# Altium PCB PCB1.PcbDoc
Units mm, origin at the board's own origin, x right, y up, seen from the top; angles counter-clockwise.
Board outline 77.98 x 58.8 mm, 2 copper layers (Top Layer, Bottom Layer), stack 1.111 mm thick; 67 components, 75 nets, 314 pads, 129 vias.
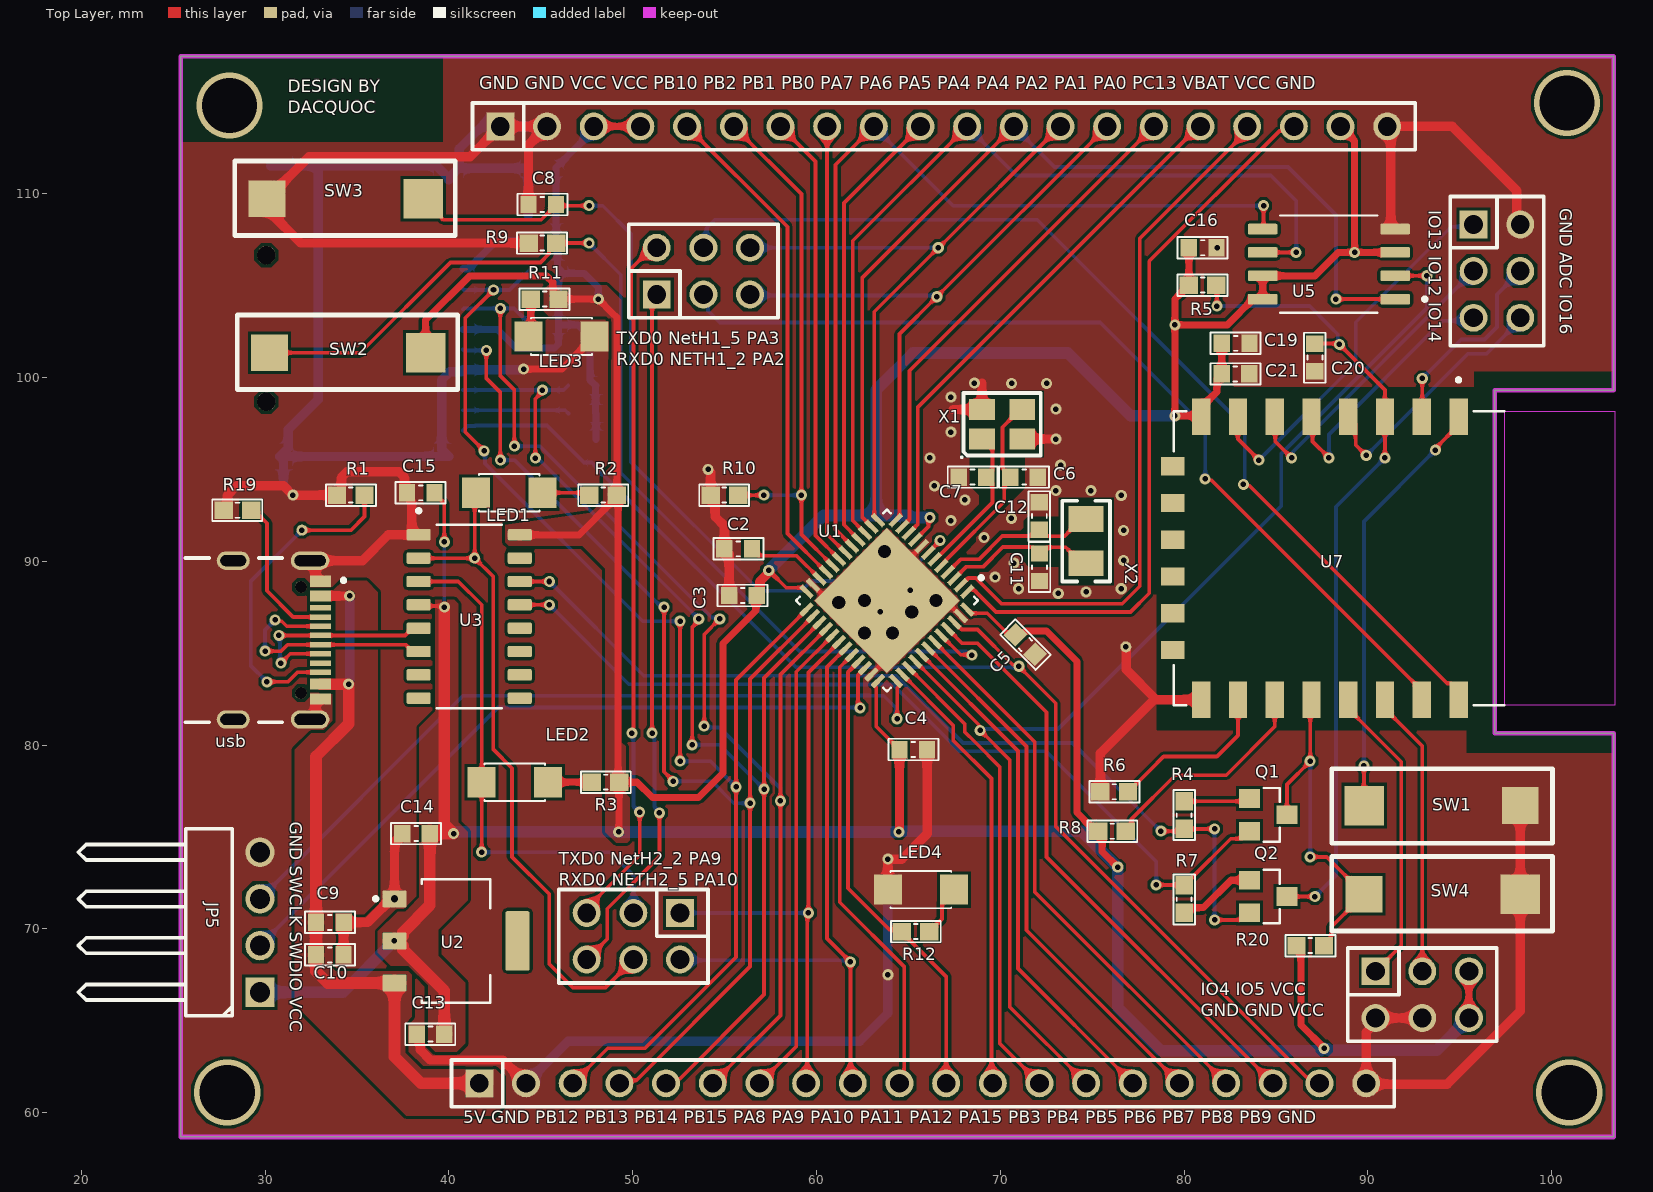
[diagram p0: Top Layer view]
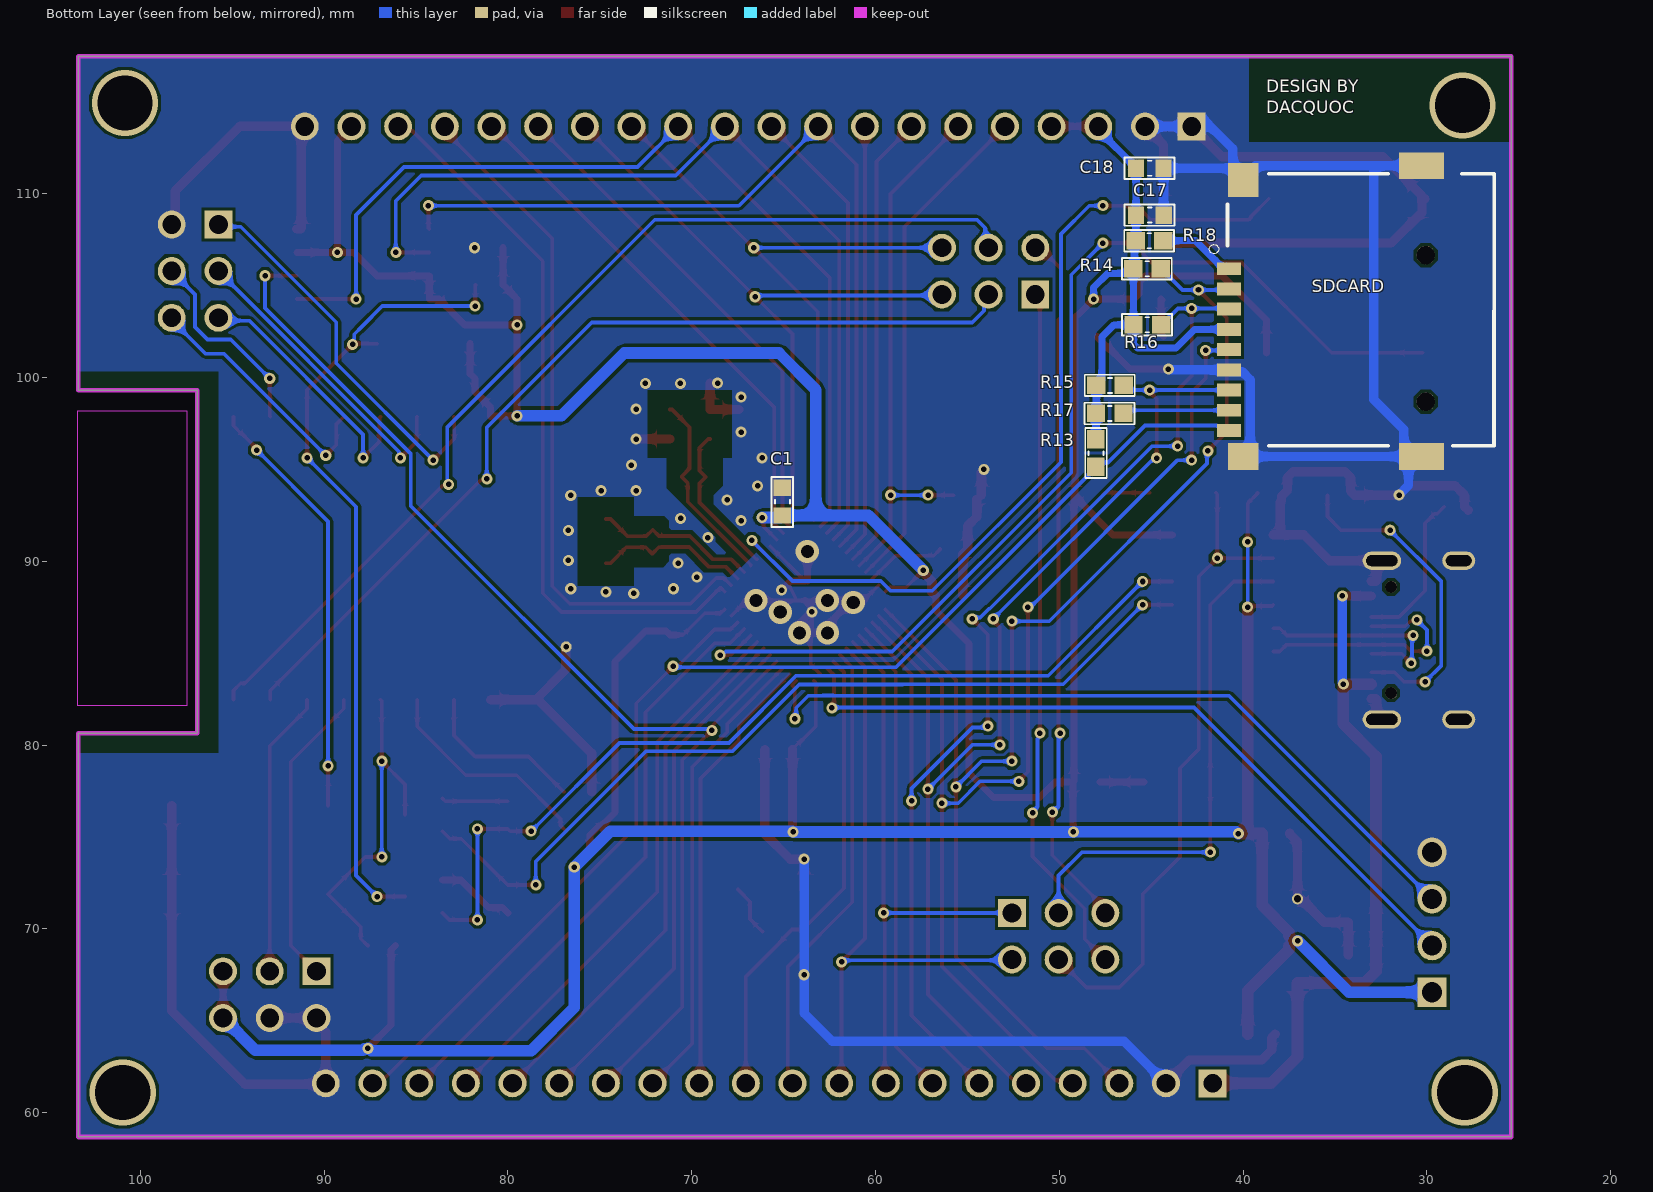
[diagram p1: Bottom Layer view, seen from below]
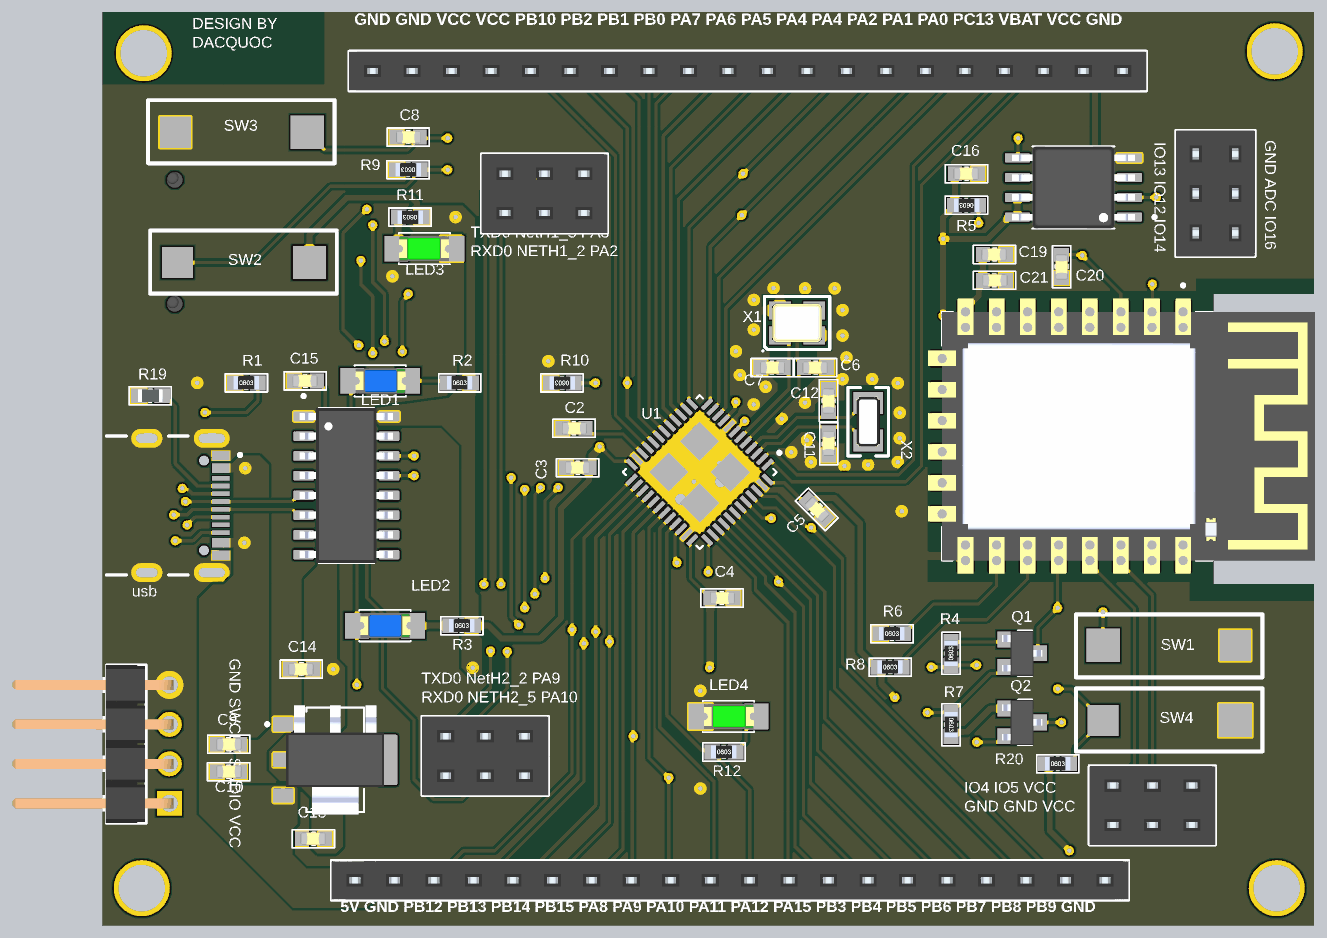
[diagram p2: 3D render of the assembled board from above, using the file's embedded part models]
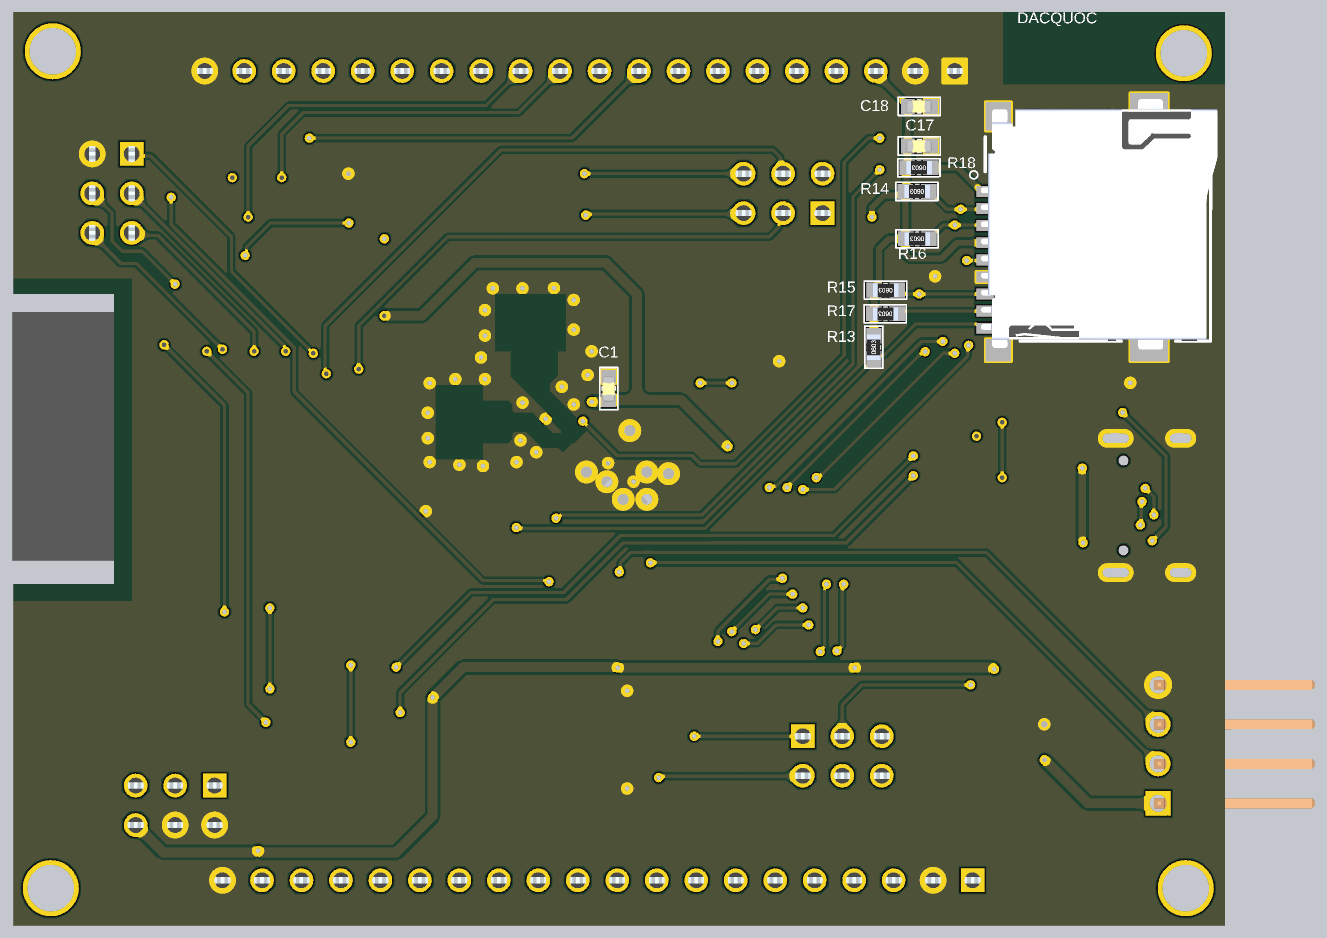
[diagram p3: 3D render of the assembled board from below, using the file's embedded part models]

## Layer stack, top to bottom
Top Solder: solder mask 0.0102, Solder Resist, Dk 3.5
Top Layer: signal copper 0.0356
Dielectric 2: dielectric 1.04, FR-4, Dk 4.8
Bottom Layer: signal copper 0.0356
Bottom Solder: solder mask 0.0102, Solder Resist, Dk 3.5

## Board outline
25.4,117.475 103.378,117.475 103.378,99.314 96.901,99.314 96.901,80.645 103.378,80.645 103.378,58.674 25.4,58.674

## Design rules (kind name [scope] priority, off if disabled: settings)
Clearance "Stitching No Net" [IsStitchingVia and InNet('No Net') vs (IsVia and (Not IsStitchingVia)) Or IsPad] p1: gap=0.1 ignorepadtopadclearanceinfootprint=FALSE
Clearance [All] p2: gap=0.152 ignorepadtopadclearanceinfootprint=FALSE
DiffPairsRouting DiffPairsRouting_1 [InDifferentialPair('USB')] p1: maxlimit=3 minlimit=0.15 mostfreqgap=0.254 toplayer_maxgap=0.3 toplayer_minwidth=0.18 toplayer_maxwidth=0.5 toplayer_prefwidth=0.381 bottomlayer_mingap=0.2 bottomlayer_minwidth=0.18 bottomlayer_maxwidth=0.5 bottomlayer_prefwidth=0.381 maxuncoupledlength=12.7
HoleSize [All] p1: absolutevalues=TRUE maxlimit=4 minlimit=0.025 maxpercent=80.000 minpercent=20.000
HoleToHoleClearance [All] p1: gap=0 allowstackedmicrovias=TRUE
LayerPairs [All] p1: enforce=FALSE
MinimumSolderMaskSliver [All] p1: minsoldermaskwidth=0
PolygonConnect [InNet('GND')] p1: connectstyle=Direct reliefconductorwidth=0.5 reliefentries=4 polygonreliefangle="45 Angle" airgapwidth=0.254
RoutingVias [All] p1: holewidth=0.711 width=1.27 viastyle="Through Hole" minholewidth=0.3 minwidth=0.5 maxholewidth=0.711 maxwidth=1.27
SilkToSilkClearance [All] p1: silktosilkclearance=0
SilkToSolderMaskClearance [IsPad] p1: minsilkscreentomaskgap=0 clearancetoexposedcopper=TRUE
SolderMaskExpansion [All] p1: expansion=0.102 istentingtop=FALSE
Width [All] p1: maxlimit=0.635 minlimit=0.203 preferedwidth=0.381
23 further rules are at their usual default settings.

## Classes and differential pairs
component class Sheet1: C1 C2 C3 C4 C5 C6 C7 C8 C9 C10 C11 C12 C13 C14 C15 C16 C17 C19 C20 C21 JP5 LED1 LED2 LED3 LED4 Q1 Q2 R1 R2 R3 R4 R5 R6 R7 R8 R9 R10 R11 R12 R13 R14 R15 R16 R17 R18 R19 R20 SDCARD SW1 SW2 SW3 SW4 U1 U2 U3 U5 U7 usb X1 X2

## Components (designator, comment, footprint, x,y, rotation, side; value= is the part's Value field where it differs from the comment)
C1 "100nF" "Cap 0603" 65.061,93.238 r270 bottom
C2 "4.7uF" "Cap 0603" 55.749,90.686 r0 top
C3 "100nF" "Cap 0603" 55.987,88.13 r180 top
C4 "100nF" "Cap 0603" 65.274,79.764 r0 top
C5 "100nF" "Cap 0603" 71.374,85.471 r315 top
C6 "18pF" "Cap 0603" 71.29,94.574 r180 top
C7 "18pF" "Cap 0603" 68.496,94.59 r0 top
C8 "100nF" "Cap 0603" 45.086,109.423 r0 top
C9 "10uF" "Cap 0603" 33.528,70.358 r0 top
C10 "100nF" "Cap 0603" 33.524,68.588 r0 top
C11 "9pF" "Cap 0603" 72.128,89.682 r90 top
C12 "9pF" "Cap 0603" 72.136,92.456 r270 top
C13 "100nF" "Cap 0603" 38.989,64.262 r180 top
C14 "10uF" "Cap 0603" 38.207,75.176 r180 top
C15 "100nF" "Cap 0603" 38.461,93.718 r180 top
C16 "100nF" "Cap 0603" 81.006,107.053 r180 top
C17 "10uF" "Cap 0603" 45.081,108.831 r0 bottom
C18 "100nF" "Cap 0603" 45.085,111.379 r0 bottom
C19 "100nF" "Cap 0603" 82.804,101.854 r180 top
C20 "100nF" "Cap 0603" 87.13,101.08 r270 top
C21 "10uF" "Cap 0603" 82.804,100.203 r0 top
H1 "JP 2x3 2.54" "JP 2x3 CT"#1 53.848,105.791 r0 top
H2 "JP 2x3 2.54" "JP 2x3 CT"#1 50.038,69.596 r180 top
JP1 "JP 2x3 2.54" "JP 2x3 CT"#1 97.028,105.791 r270 top
JP2 "JP 2x3 2.54" "JP 2x3 CT"#2 92.964,66.421 r0 top
JP5 "JP 1x4 2.54" "JP 1x4 DC" 27.178,75.438 r90 top
JP6 "JP 1x20 2.54" "JP 1x20 CT" 41.656,61.595 r0 top
JP7 "JP 1x20 2.54" "JP 1x20 CT" 42.799,113.665 r0 top
LED1 "LED" LED-1206-Blue 45.085,93.726 r180 top value="LED 3 - 5 ly 2 Colour"
LED2 "LED" LED-1206-Blue 45.39,77.978 r180 top value="LED 3 - 5 ly 2 Colour"
LED3 "LED" LED-1206-Green 44.323,102.235 r0 top value="LED 3 - 5 ly 2 Colour"
LED4 "LED" LED-1206-Green 67.488,72.136 r180 top value="LED 3 - 5 ly 2 Colour"
Q1 "S8050" SOT-23 84.582,76.2 r270 top
Q2 "S8050" SOT-23 84.582,71.755 r270 top
R1 "5.1K" "tro smd 0603" 34.659,93.599 r0 top
R2 "1K" "tro smd 0603" 48.387,93.599 r0 top
R3 "1K" "tro smd 0603" 48.526,77.978 r0 top
R4 "10K" "tro smd 0603" 80.01,76.188 r90 top
R5 "10K" "tro smd 0603" 81.014,105.029 r180 top
R6 "10K" "tro smd 0603" 76.2,77.459 r0 top
R7 "10K" "tro smd 0603" 80.01,71.616 r270 top
R8 "10K" "tro smd 0603" 76.085,75.311 r0 top
R9 "10K" "tro smd 0603" 45.085,107.315 r180 top
R10 "1K" "tro smd 0603" 54.991,93.599 r180 top
R11 "1K" "tro smd 0603" 45.212,104.267 r180 top
R12 "1K" "tro smd 0603" 65.393,69.85 r0 top
R13 "10K" "tro smd 0603" 48.006,95.885 r90 bottom
R14 "10K" "tro smd 0603" 45.224,105.918 r0 bottom
R15 "10K" "tro smd 0603" 47.244,99.568 r0 bottom
R16 "10K" "tro smd 0603" 45.212,102.87 r0 bottom
R17 "10K" "tro smd 0603" 47.256,98.044 r0 bottom
R18 "10K" "tro smd 0603" 45.097,107.442 r0 bottom
R19 "5.1K" "RES 0603" 28.496,92.777 r180 top
R20 "10K" "tro smd 0603" 86.868,69.088 r0 top
SDCARD "SDCARD" SDCARD 33.593,103.688 r90 bottom
SW1 "TACTILE SWITCH" SW_342_SMD 98.298,76.708 r0 top
SW2 "TACTILE SWITCH" SW_342_SMD 30.235,101.346 r180 top
SW3 "TACTILE SWITCH" SW_342_SMD 30.099,109.728 r180 top
SW4 "TACTILE SWITCH" SW_342_SMD 89.798,71.882 r180 top
U1 "STM32F411CEU6" QFN50P700X700X60-49N 63.836,87.864 r225 top
U2 "AMS1117-3.3" SOT229P700X180-4N 40.386,69.342 r270 top
U3 "CH340C" SOIC127P600X180-16N 41.104,86.995 r0 top
U5 "W25Q128JVSIQ" SOIC127P790X216-8N 87.884,106.172 r180 top
U7 "ESP-12F" XCVR_ESP-12F 91.44,90.17 r270 top
usb "USB4105-GF-A" GCT_USB4105-GF-A 28.265,85.713 r270 top (schematic designator USB2)
X1 "25MHz" "EPSON TSX-3225" 70.104,97.457 r0 top
X2 "32.768kHz" "ABRACON ABS07" 74.675,91.098 r270 top

## Footprints (in the part's own frame and the unit in brackets; to place one, negate y for a bottom-side part, rotate by r counter-clockwise, add the part's x,y. Pads: shape width x height; smd on the part's side, far side on the other; paste and mask are expansions set on the pad)
"ABRACON ABS07" [mm] "Crystal, 2-Leads, Body 3.20x1.50mm, IPC Medium Density"
  rect 1.4x1.9 smd: 1(-1.2,0) 2(1.2,0)
  silkscreen extent -2.2,-1.3 2.2,1.3, body extent -1.62,-0.77 1.63,0.78, height 0.9
"Cap 0603" [mm]
  rect 0.889x0.95 smd mask+0.076: 1(-0.758,-0.008) 2(0.742,-0.008)
  silkscreen extent -1.35,-0.59 1.36,0.58, body extent -0.77,-0.41 0.83,0.39, height 0.78
"EPSON TSX-3225" [mm] "Crystal, 4-Leads, Body 2.50x3.20mm, Pitch 2.20mm, IPC Medium Density"
  rect 1.4x1.15 smd: 1(-1.1,-0.8) 2(1.1,-0.8) 3(1.1,0.8) 4(-1.1,0.8)
  silkscreen extent -2.25,-1.85 2.1,1.7, body extent -1.61,-1.26 1.61,1.26, height 0.6
GCT_USB4105-GF-A [mm]
  rect 0.6x1.15 smd mask+0.05: A1_B12(-3.2,4.755) A4_B9(-2.4,4.755) B1_A12(3.2,4.755) B4_A9(2.4,4.755)
  rect 0.3x1.15 smd mask+0.05: A5(-1.25,4.755) A6(-0.25,4.755) A7(0.25,4.755) A8(1.25,4.755) B5(1.75,4.755) B6(0.75,4.755) B7(-0.75,4.755) B8(-1.75,4.755)
  oval 1x2.1 hole 0.6 slot 1.7 at 90 deg: SH1(-4.32,4.18) SH2(4.32,4.18)
  oval 1x1.8 hole 0.6 slot 1.4 at 90 deg: SH3(-4.32,0) SH4(4.32,0)
  round 0.65 hole 0.65 unplated: ""(-2.89,3.68) ""(2.89,3.68)
  silkscreen extent -4.47,-2.6 4.47,6.1
"JP 1x4 DC" [mm] "4 pins, 1 row, right angled, gold plating"
  rect 1.6x1.6 hole 1.1: 1(-8.89,-2.54)
  round 1.6 hole 1.1: 2(-6.35,-2.54) 3(-3.81,-2.54) 4(-1.27,-2.54)
  silkscreen extent -10.16,-1.04 0,7.34, body extent -10.16,-2.79 0,7.57, height 2.54
"JP 1x20 CT" [mm] "20 row, straight, gold plating"
  rect 1.52x1.52 hole 1.02: 1(0,0)
  round 1.52 hole 1.02: 2(2.54,0) 3(5.08,0) 4(7.62,0) 5(10.16,0) 6(12.7,0) 7(15.24,0) 8(17.78,0) 9(20.32,0) 10(22.86,0) 11(25.4,0) 12(27.94,0) 13(30.48,0) 14(33.02,0) 15(35.56,0) 16(38.1,0) 17(40.64,0) 18(43.18,0) 19(45.72,0) 20(48.26,0)
  silkscreen extent -1.52,-1.27 49.78,1.27, body extent -1.52,-1.25 49.78,1.25, height 8.51
"JP 2x3 CT"#1 [mm]
  rect 1.52x1.52 hole 1.02: 1(-2.54,-1.27)
  round 1.52 hole 1.02: 2(0,-1.27) 3(2.54,-1.27) 4(2.54,1.27) 5(0,1.27) 6(-2.54,1.27)
  silkscreen extent -4.06,-2.54 4.06,2.54, body extent -4.06,-2.54 4.06,2.54, height 8.51
"JP 2x3 CT"#2 [mm]
  rect 1.52x1.52 hole 1.02: 1(-2.54,1.27)
  round 1.52 hole 1.02: 2(0,1.27) 3(2.54,1.27) 4(2.54,-1.27) 5(0,-1.27) 6(-2.54,-1.27)
  silkscreen extent -4.06,-2.54 4.06,2.54, body extent -4.06,-2.54 4.06,2.54, height 8.51
LED-1206-Blue [mil] "Compoment SMD 120x60mil"
  rect 60x65 smd: 1(0,0) 2(142,0)
  silkscreen extent 6,-40 136,40, body extent 7,-31 133,32, height 43
LED-1206-Green [mil]
  rect 60x65 smd: 1(0,0) 2(142,0)
  silkscreen extent 6,-40 136,40, body extent 7,-31 133,32, height 43
QFN50P700X700X60-49N [mm]
  rrect25% 0.87x0.27 smd: 1(-3.43,2.75) 2(-3.43,2.25) 3(-3.43,1.75) 4(-3.43,1.25) 5(-3.43,0.75) 6(-3.43,0.25) 7(-3.43,-0.25) 8(-3.43,-0.75) 9(-3.43,-1.25) 10(-3.43,-1.75) 11(-3.43,-2.25) 12(-3.43,-2.75) 25(3.43,-2.75) 26(3.43,-2.25) 27(3.43,-1.75) 28(3.43,-1.25) 29(3.43,-0.75) 30(3.43,-0.25) 31(3.43,0.25) 32(3.43,0.75) 33(3.43,1.25) 34(3.43,1.75) 35(3.43,2.25) 36(3.43,2.75)
  rrect25% 0.27x0.87 smd: 13(-2.75,-3.43) 14(-2.25,-3.43) 15(-1.75,-3.43) 16(-1.25,-3.43) 17(-0.75,-3.43) 18(-0.25,-3.43) 19(0.25,-3.43) 20(0.75,-3.43) 21(1.25,-3.43) 22(1.75,-3.43) 23(2.25,-3.43) 24(2.75,-3.43) 37(2.75,3.43) 38(2.25,3.43) 39(1.75,3.43) 40(1.25,3.43) 41(0.75,3.43) 42(0.25,3.43) 43(-0.25,3.43) 44(-0.75,3.43) 45(-1.25,3.43) 46(-1.75,3.43) 47(-2.25,3.43) 48(-2.75,3.43)
  rect 5.6x5.6 smd paste-4: 49(0,0)
  silkscreen extent -4.6,-3.5 3.5,3.5
"RES 0603" [mm] "RES 0603"
  rect 1x0.95 smd mask+0.076: 1(-0.75,0) 2(0.75,0)
  silkscreen extent -1.35,-0.58 1.37,0.58, body extent -0.8,-0.4 0.8,0.4, height 0.45
SDCARD [mm]
  rect 0.7x1.3 smd: 1(2.23,7.174) 2(1.13,7.174) 3(0.03,7.174) 4(-1.07,7.174) 5(-2.17,7.174) 6(-3.27,7.174) 7(-4.37,7.174) 8(-5.47,7.174) CD1(-6.57,7.174)
  rect 1.448x1.651 smd: MP1(-7.989,6.4)
  rect 1.448x2.438 smd: MP2(-7.989,-3.3) MP3(7.836,-3.3)
  rect 1.854x1.651 smd: MP4(7.061,6.4)
  round 1 hole 1 unplated: ""(-5.004,-3.531) ""(2.972,-3.531)
  silkscreen extent -7.4,-7.26 7.4,8.24, body extent -7.94,-7.69 8.16,7.51, height 2
SOIC127P600X180-16N [mm]
  rrect25% 1.31x0.62 smd: 1(-2.75,4.445) 2(-2.75,3.175) 3(-2.75,1.905) 4(-2.75,0.635) 5(-2.75,-0.635) 6(-2.75,-1.905) 7(-2.75,-3.175) 8(-2.75,-4.445) 9(2.75,-4.445) 10(2.75,-3.175) 11(2.75,-1.905) 12(2.75,-0.635) 13(2.75,0.635) 14(2.75,1.905) 15(2.75,3.175) 16(2.75,4.445)
  silkscreen extent -2.85,-5 1.78,5.85, body extent -3,-5 3,5, height 1.8
SOIC127P790X216-8N [mm]
  rrect25% 1.61x0.58 smd: 1(-3.605,1.905) 2(-3.605,0.635) 3(-3.605,-0.635) 4(-3.605,-1.905) 5(3.605,-1.905) 6(3.605,-0.635) 7(3.605,0.635) 8(3.605,1.905)
  silkscreen extent -5.32,-2.64 2.64,2.64, body extent -3.95,-2.64 3.95,2.64, height 2.16
SOT229P700X180-4N [mm]
  rrect15% 0.93x1.31 smd: 1(-2.29,-3.345) 2(0,-3.345) 3(2.29,-3.345)
  rrect15% 3.24x1.31 smd: 4(0,3.345)
  silkscreen extent -3.36,-4.47 3.36,1.86, body extent -3.5,-3.15 3.5,3.15, height 1.8
SOT-23 [mil]
  rect 40x45 smd: 1(-35,-40) 2(35,-40) 3(0,40)
  silkscreen extent -58,-10 58,25, body extent -57,-51 57,51, height 55
SW_342_SMD [mm] "CASE: SMD"
  rect 2x2 smd: 1(0,0)
  rect 2.15x2.15 smd: 2(-8.5,0)
  silkscreen extent -10.25,-2.06 1.75,2, body extent -7.17,-1.79 -1.17,1.71, height 2.4
"tro smd 0603" [mm] "Chip Capacitor, 2-Leads, Body 1,60x0,80mm, IPC Medium Density"
  rect 1x0.95 smd mask+0.076: 1(-0.75,0) 2(0.75,0)
  silkscreen extent -1.35,-0.58 1.37,0.58, body extent -0.82,-0.42 0.82,0.43, height 0.44
XCVR_ESP-12F [mm]
  rect 2x1 smd paste+0 mask+0.102: 1(-7.7,3.5) 2(-7.7,1.5) 3(-7.7,-0.5) 4(-7.7,-2.5) 5(-7.7,-4.5) 6(-7.7,-6.5) 7(-7.7,-8.5) 8(-7.7,-10.5) 15(7.7,-10.5) 16(7.7,-8.5) 17(7.7,-6.5) 18(7.7,-4.5) 19(7.7,-2.5) 20(7.7,-0.5) 21(7.7,1.5) 22(7.7,3.5)
  rect 1x1.3 smd paste+0 mask+0.102: 9(-5,-12.05) 10(-3,-12.05) 11(-1,-12.05) 12(1,-12.05) 13(3,-12.05) 14(5,-12.05)
  Keep-Out Layer region: 8,6 -8,6 -8,12 8,12
  silkscreen extent -9.8,-12 8,6, body extent -8.85,-12.9 8.85,12, height 3.1

## Part data
C1 C2 C3 C4 C5 C6 C7 C8 C9 C10 C11 C12 C13 C14 C16 C17 C18 C19 C20 C21: library part "Cap 1206", "Capacitor SMD 1206"
C15: library part "Cap 0805", "Capacitor SMD 0805"
H1 H2 JP1 JP2: library part "JP 2x3 2.54 Cai Thang", "Cắm", Chung_Loai=Cắm, Don_Vi=Con, Ma_Hang=MH008647, Ten_Linh_Kien="Jump Đôi Cái 2.54MM 2x20P Thẳng"
JP5: library part "JP 1x4 2.54 Duc Cong", "Cắm", Chung_Loai=Cắm, Don_Vi=Con, Ma_Hang=MH000904, Ten_Linh_Kien="Jump Đơn Đực 2.54MM 1x40P Cong Đứng"
JP6 JP7: library part "JP 1x20 2.54 Cai Thang", "Cắm", Chung_Loai=Cắm, Don_Vi=Con, Ma_Hang=MH004006, Ten_Linh_Kien="Jump Đơn Cái 2.54MM 1x20P Thẳng"
LED1 LED2 LED3 LED4: library part "LED SMD"
Q1 Q2: library part SMD-TRANSISTORS-NPN-25V-500MW(SOT-23), "Bipolar (BJT) Transistor NPN 25 V 500 mA 150MHz 300 mW Surface Mount SOT-23", Package=None, Availability="In Stock", Check_prices=https://www.snapeda.com/parts/S8050/Umwelt+Sensor+Teknik/view-part/?ref=eda, MF=UMW, MP=S8050, Price=None, Purchase-URL=https://pricing.snapeda.com/search/part/S8050/?ref=eda, SnapEDA_Link=https://www.snapeda.com/parts/S8050/Umwelt+Sensor+Teknik/view-part/?ref=snap
R1 R2 R3 R4 R5 R6 R7 R8 R9 R10 R11 R12 R13 R14 R15 R16 R17 R18 R19 R20: library part Res-SMD, "Resistor", Manufacturer="Generic Components", Class=Passive, Published=08/06/2000, Publisher="Altium Hobart Technology Centre"
SW1 SW2 SW3 SW4: library part SW1_RS-282G05A3-SMRT-SMD, "Tactile Switch SPST-NO Top Actuated Surface Mount", Alternate Part Number-1=NA, Case/Package=SMD, Manufacturer="ITT C&K", Manufacturer Part Number=RS-282G05A3-SMRT, Supplier Part Number-1=RS-282G05A3-SMRT, Supplier-1="SP ROAD"
U1: "High-performance access line, ARM Cortex-M4 core with DSP and FPU, 512 Kbytes Flash, 100 MHz CPU, ART Accelerator", Package=None, Availability=Unavailable, MP=STM32F411CEU6, Price=None
U2: "Linear Voltage Regulator IC Positive Fixed 1 Output 1A SOT-223-3L", Package="SOT-223-3L UMW", Check_prices=https://www.snapeda.com/parts/AMS1117-3.3/UMW/view-part/?ref=eda, MF=UMW, MP=AMS1117-3.3, SnapEDA_Link=https://www.snapeda.com/parts/AMS1117-3.3/UMW/view-part/?ref=snap
U3: library part CH340G, "USB Interface Integrated Circuit", MP=Ch340C
U5: "FLASH - NOR Memory IC 128Mb (16M x 8) SPI - Quad I/O, QPI, DTR 133 MHz 8-SOIC", Package="SOIC-8 Winbond Electronics", Check_prices=https://www.snapeda.com/parts/W25Q128JVSIQ/Winbond/view-part/?ref=eda, MF="Winbond Electronics", MP=W25Q128JVSIQ, SnapEDA_Link=https://www.snapeda.com/parts/W25Q128JVSIQ/Winbond/view-part/?ref=snap
U7: "WiFi Module", Package=Package, Check_prices=https://www.snapeda.com/parts/ESP-12F/AI-Thinker/view-part/?ref=eda, MF=AI-Thinker, MP=ESP-12F, SnapEDA_Link=https://www.snapeda.com/parts/ESP-12F/AI-Thinker/view-part/?ref=snap
usb: Package=None, Availability=Unavailable, MF="{'manufacturer': u'GCT'}", MP=USB4105-GF-A, Price=None
X1: library part "TSX-3225 25.0000MF10P-C3", "CRYSTAL 25.00 MHZ 18.0PF SMD", ESR (Equivalent Series Resistance)="40 Ohms", Frequency Stability=±10ppm, Load Capacitance=18pF, Manufacturer=EPSON, Operating Mode=Fundamental, Operating Temperature="-20°C ~ 85°C", Package / Case="4-SMD, No Lead", Supplier Part Number 1=SER4374CT-ND, ComponentLink1Description=Datasheet, ComponentLink1URL=https://support.epson.biz/td/api/doc_check.php?dl=brief_TSX-3225&lang=en, ComponentLink2Description="DigiKey Link", ComponentLink2URL=http://digikey.com/product-detail/en/epson/TSX-3225-25.0000MF10P-C3/SER4374CT-ND/7932358, Frequency=25MHz, Frequency Tolerance=±10ppm, Height - Seated (Max)="0.024\" (0.60mm)", LastUpdated="9/2/2020 1:21:54 AM", Lifecycle Status=Active, Minimum Order=1, Mounting Type="Surface Mount", Packaging=TapeAndReel, Part Number="TSX-3225 25.0000MF10P-C3", Part Status=Active, PartId=445, Price=0.22, Series=TSX-3225, Size / Dimension="0.126\" L x 0.098\" W (3.20mm x 2.50mm)", Supplier 1=DigiKey, Type="MHz Crystal"
X2: library part ABS07-32.768KHZ-9-1-T, "CRYSTAL 32.768KHZ 9PF SMD", ESR (Equivalent Series Resistance)="70 kOhms", Frequency Tolerance=±10ppm, Load Capacitance=9pF, Manufacturer="Abracon LLC", Operating Mode=Fundamental, Operating Temperature="-40°C ~ 85°C", Package / Case="2-SMD, No Lead", Supplier Part Number 1=535-13479-1-ND, ComponentLink1Description=Datasheet, ComponentLink1URL=https://abracon.com/Resonators/ABS07.pdf, ComponentLink2Description="DigiKey Link", ComponentLink2URL=http://digikey.com/product-detail/en/abracon-llc/ABS07-32.768KHZ-9-1-T/535-13479-1-ND/5980155, Frequency=32.768kHz, Height - Seated (Max)="0.035\" (0.90mm)", LastUpdated="9/2/2020 1:21:47 AM", Lifecycle Status=Active, Minimum Order=0, Mounting Type="Surface Mount", Packaging=TapeAndReel, Part Number=ABS07-32.768KHZ-9-1-T, Part Status=Active, PartId=380, Price=0.55, Series=ABS07, Size / Dimension="0.126\" L x 0.059\" W (3.20mm x 1.50mm)", Supplier 1=DigiKey, Type="kHz Crystal (Tuning Fork)"

## Free pads (board coordinates)
  round 0.6 hole 0.3: 4(32.004,91.694) 6(76.835,85.344) 7(54.102,94.996)
  round 0.6 hole 0.4: 5(37.041,71.632)

## Via types
v1: diameter 0.6, hole 0.3, Top Layer to Bottom Layer, 118 vias
v2: diameter 1.27, hole 0.711, Top Layer to Bottom Layer, 7 vias
v3: diameter 3.6, hole 3, Top Layer to Bottom Layer, 4 vias

## Nets (pads, with @x,y where several pads share a name; then routed paths per layer and width w, separated by ;. In a path a pad name is that pad's centre, name@x,y a point inside that pad or via, vN(x,y) a via of type N, cw(c..) or ccw(c..) an arc to the next point about the centre after c; other vN are vias at no path point)
+5: C9.1 C10.1 JP6.1 U2.3 usb.A4_B9 usb.B4_A9 | length 38.1
  Top Layer w0.508: usb.A4_B9 v1(34.596,88.113)
  Top Layer w0.635: usb.B4_A9 v1(34.544,83.312) v1(34.544,83.312) 34.544,81.153 32.766,79.375 32.766,70.354 32.768,70.352 32.768,68.582 C10.1 32.766,67.691 33.405,67.052 U2.3 37.041,63.035 38.481,61.595 JP6.1
  Bottom Layer w0.508: v1(34.544,83.312) 34.544,83.337 34.596,83.389 v1(34.596,88.113)
ADC: JP1.5 U7.2 | length 10.9
  Top Layer w0.203: U7.2 92.964,97.894 v1(92.964,99.949)
  Bottom Layer w0.203: v1(92.964,99.949) 95.087,102.072 96.357,102.072 97.028,102.743 97.028,104.521 JP1.5
BOOT0: R9.1 SW2.1 U1.44 | length 58.6
  Top Layer w0.203: SW2.1 35.179,101.346 40.087,106.254 44.977,106.254 45.437,106.714 45.437,106.942 R9.1@45.81,107.315 ; R9.1 R9.1@45.81,107.315 ; v1(47.625,107.315) R9.1@45.81,107.315 ; U1.44 67.849,84.912 68.43,84.912 v1(68.453,84.889)
  Bottom Layer w0.203: v1(47.625,107.315) 49.353,105.587 49.353,94.822 59.085,85.09 68.145,85.09 68.346,84.889 v1(68.453,84.889)
D+: U3.5 usb.A6 usb.B6 | length 11.7
  Top Layer w0.203: v1(30.75,85.963) usb.A6 37.612,85.963 38.009,86.36 U3.5 ; v1(30.861,84.455) 31.369,84.963 usb.B6
  Bottom Layer w0.203: v1(30.75,85.963) 30.806,85.907 30.806,84.51 v1(30.861,84.455)
D-: U3.6 usb.A7 usb.B7 | length 13.2
  Top Layer w0.203: v1(29.993,85.111) 30.87,85.111 31.223,85.463 usb.A7 37.636,85.463 38.009,85.09 U3.6 ; v1(30.548,86.81) 30.624,86.734 30.906,86.734 31.177,86.463 usb.B7
  Bottom Layer w0.203: v1(29.993,85.111) 29.993,86.254 v1(30.548,86.81)
EN: C20.1 Q2.3 R5.1 U7.3 | length 44.5
  Top Layer w0.203: R5.1 81.788,105.005 v1(81.788,103.886) ; Q2.3 v1(87.122,71.755) ; C20.1 87.597,101.838 87.61,101.851 88.405,101.851 90.932,99.324 U7.3@90.932,97.862 ; v1(90.932,95.631) U7.3@90.932,97.862 ; U7.3 U7.3@90.932,97.862
  Bottom Layer w0.203: v1(81.788,103.886) 86.836,103.886 87.948,102.775 88.37,102.352 88.37,102.114 88.383,102.101 88.383,101.872 v1(88.459,101.796) ; v1(87.122,71.755) 88.265,72.898 88.265,92.964 v1(90.932,95.631)
GND: C1.1 C2.1 C3.2 C4.2 C5.2 C6.1 C7.1 C8.1 C9.2 C10.2 C11.1 C12.1 C13.2 C14.2 C15.2 C16.1 C17.1 C18.1 C19.1 C20.2 C21.2 JP1.6 JP2.5 JP2.6 JP5.4 JP6.2 JP6.20 JP7.1 JP7.2 JP7.20 LED3.2 LED4.2 pad.5 pad.6 pad.7 R1.1 R6.1 R9.2 R10.2 R19.2 SDCARD.6 SDCARD.MP1 SDCARD.MP2 SDCARD.MP3 SDCARD.MP4 SW1.1 SW3.1 SW4.2 U1.8 U1.23 U1.35 U1.47 U1.49 U2.1 U3.1 U5.4 U7.15 usb.A1_B12 usb.B1_A12 usb.SH1 usb.SH2 usb.SH3 usb.SH4 X1.2 X1.4 | length 277.1
  Top Layer w0.203: U1.23 60.654,87.864 U1.49@61.214,87.864 ; U1.49@61.403,87.864 v2(62.619,87.864) U1.49 U1.49@64.302,87.864 ; U1.35 63.519,84.365 63.519,86.106 63.519,86.115 63.447,86.187 U1.49@63.447,86.772 ; v1(63.469,87.243) 63.469,86.772 U1.49@63.881,86.36 ; U1.49@63.503,86.187 63.676,86.36 U1.49@63.881,86.36 ; U1.49@63.602,86.395 U1.49@63.681,86.56 ; U1.49@63.836,88.924 U1.8 ; v2(64.135,86.106) U1.49@63.881,86.36 ; U1.49@64.725,88.753 U1.49@64.302,87.864 ; U1.47 67.018,87.864 v2(66.503,87.864) U1.49@64.302,87.864
  Top Layer w0.381: v1(44.069,100.457) 46.152,100.457 47.295,101.6 47.358,101.6 47.93,102.171 LED3.2 ; v2(61.214,87.757) 61.403,87.757 63.054,86.106 63.519,86.106 v2(64.135,86.106) 64.135,86.614 63.512,87.237 63.512,87.54 U1.49 ; U1.49@63.709,88.924 v2(63.709,90.531) ; U1.49@63.836,88.924 64.619,88.924 v1(65.107,88.436)
  Top Layer w0.508: R19.2 27.95,92.982 27.95,93.609 28.448,94.107 31,94.107 v1(31.508,93.599) 33.934,93.599 34.155,93.82 34.155,94.571 34.453,94.869 37.286,94.869 37.583,94.571 37.583,93.862 C15.2 37.91,93.535 37.91,93.271 37.973,93.207 37.973,91.496 U3.1@38.029,91.44 ; SW3.1 SW3.1@30.29,109.537 ; usb.SH2 32.505,81.393 32.732,81.62 32.732,82.467 32.778,82.513 usb.B1_A12 ; usb.SH1 35.296,90.033 36.703,91.44 U3.1@38.029,91.44 ; usb.SH1@32.732,89.806 32.732,88.959 32.778,88.913 usb.A1_B12 ; C10.2 34.268,68.582 34.268,70.348 C9.2 35.569,70.35 36.851,71.632 U2.1 37.041,74.73 37.465,75.153 C14.2 C14.2@37.465,75.215 ; C13.2 38.437,64.08 38.437,63.417 38.989,62.865 42.926,62.865 JP6.2 ; U3.1 U3.1@38.029,91.44 ; C8.1 44.328,112.654 JP7.2 JP7.1 41.148,112.014 32.385,112.014 30.29,109.918 SW3.1@30.29,109.537 ; R9.2 31.935,107.315 30.268,108.982 30.268,109.516 SW3.1@30.29,109.537 ; pad.7 54.102,94.971 54.241,94.832 R10.2 ; R10.2@54.487,93.378 54.487,92.419 54.991,91.915 C2.1 54.991,90.647 55.245,90.393 C3.2 ; LED4.2 v1(63.881,73.787) 64.643,73.787 66.02,75.165 66.02,79.752 C4.2 ; 67.437,98.257 X1.4 69.004,99.695 ; X1.2 v1@73.025,96.657 ; R6.1 75.45,79.554 78.366,82.47 U7.15 ; pad.6 76.853,85.326 76.853,84.107 78.49,82.47 ; U5.4 91.289,108.077 91.253,108.113 91.253,113.471 JP7.20 91.253,113.665 94.603,113.665 98.113,110.154 98.113,108.516 JP1.6 ; JP2.5 JP2.6 90.424,64.877 89.916,64.369 JP6.20 89.96,61.551 94.317,61.551 98.298,65.532 SW4.2 SW1.1
  Bottom Layer w0.381: v1(63.469,87.243) v1@63.511,87.201
  Bottom Layer w0.508: SDCARD.MP3 32.621,111.524 ; v1(31.508,93.599) 31.508,93.624 30.998,94.134 30.998,95.49 SDCARD.MP2@30.788,95.7 ; SDCARD.MP4 SDCARD.MP4@39.993,110.816 ; SDCARD.MP4@40.565,111.387 C18.1 44.325,111.385 44.325,108.841 C17.1 ; v1(44.069,100.457) 44.044,100.457 44.005,100.418 SDCARD.6 40.671,100.322 40.053,100.322 39.609,99.878 39.609,96.084 SDCARD.MP1 SDCARD.MP2@30.788,95.7 ; JP6.2 46.482,63.881 62.357,63.881 63.881,65.405 v1(63.881,67.5) v1(63.881,73.787) ; JP7.2 JP7.1 42.301,113.665 42.293,113.673 42.293,114.032 42.222,114.104 40.565,112.447 40.565,111.422 39.993,110.851 39.32,111.524 32.621,111.524 ; SDCARD.MP2@30.788,95.7 31.258,96.169 31.258,97.171 32.893,98.806 32.893,111.252 32.621,111.524
  other v1: 73.156,88.251 74.672,88.333 70.997,88.505 76.585,88.505 69.727,89.14 70.743,89.902 76.708,90.043 69.123,91.283 76.712,91.68 67.316,92.21 70.612,92.329 68.082,93.346 76.585,93.585 73.029,93.839 74.934,93.839 66.421,94.107 73.283,95.236 66.167,95.631 73.029,96.643 67.32,97.029 73.029,98.284 67.32,98.934 70.616,99.681 72.521,99.681 68.59,99.696 81.814,107.061
  other v2: 62.611,86.106 65.187,87.235
IO0: Q1.3 R20.2 SW4.1 U7.18 | length 19.5
  Top Layer w0.203: Q1.3 85.598,77.851 v1(86.868,79.121) 86.868,82.398 U7.18 ; v1(86.868,73.914) 87.766,73.914 SW4.1 88.017,70.101 88.017,69.461 87.643,69.088 R20.2
  Bottom Layer w0.203: v1(86.868,73.914) v1(86.868,79.121)
IO4: JP2.1 U7.19 | length 16.6
  Top Layer w0.203: U7.19 88.94,81.97 91.821,79.089 91.821,69.088 JP2.1
IO5: JP2.2 U7.20 | length 15.6
  Top Layer w0.203: U7.20 90.94,81.97 92.964,79.946 JP2.2
IO12: JP1.2 U7.6 | length 16.9
  Top Layer w0.203: U7.6 84.963,97.847 84.963,96.52 v1(85.852,95.631)
  Bottom Layer w0.203: v1(85.852,95.631) 85.928,95.707 85.928,95.961 JP1.2
IO13: JP1.1 U7.7 | length 21.1
  Top Layer w0.203: U7.7 82.931,97.861 82.931,96.647 v1(84.074,95.504)
  Bottom Layer w0.203: v1(84.074,95.504) 89.347,100.777 89.347,103.007 94.544,108.204 95.631,108.204 JP1.1
IO14: JP1.3 U7.5 | length 14.4
  Top Layer w0.203: U7.5 86.995,97.815 86.995,96.52 v1(87.884,95.631)
  Bottom Layer w0.203: v1(87.884,95.631) 87.884,96.901 94.07,103.087 95.594,103.087 JP1.3
IO16: JP1.4 U7.4 | length 14.1
  Top Layer w0.203: U7.4 89.339,97.472 89.339,96.335 v1(89.916,95.758)
  Bottom Layer w0.203: v1(89.916,95.758) 95.449,101.291 96.465,101.291 98.298,103.124 JP1.4
Net_2: H1.2 U7.21 | length 50.5
  Top Layer w0.203: v1(81.153,94.488) 81.229,94.412 81.498,94.412 92.94,82.97 U7.21
  Bottom Layer w0.203: H1.2 54.1,104.269 54.1,103.746 54.102,103.744 54.102,103.632 54.737,102.997 75.438,102.997 81.153,97.282 v1(81.153,94.488)
Net_2: H2.2 LED2.2 U3.3 | length 28.2
  Top Layer w0.203: U3.3 40.513,88.9 41.783,87.63 LED2.2 v1(41.783,74.168)
  Bottom Layer w0.203: v1(41.783,74.168) 48.768,74.168 50.038,72.898 H2.2
Net_5: H2.5 LED1.2 U3.2 | length 36.1
  Top Layer w0.203: U3.2 v1(41.402,90.17) ; LED1.2 41.402,93.65 v1(41.402,90.17) ; H2.5 48.514,66.802 46.736,66.802 45.466,68.072 45.466,71.882 43.434,73.914 43.434,78.74 42.418,79.756 42.418,89.154 v1(41.402,90.17)
Net_5: H1.5 U7.22 | length 55.3
  Top Layer w0.203: v1(83.235,94.184) 83.311,94.108 83.565,94.108 94.309,83.364 94.542,83.364 94.94,82.965 U7.22
  Bottom Layer w0.203: H1.5 54.023,107.236 54.023,108.125 54.483,108.585 72.009,108.585 83.312,97.282 83.312,94.502 83.311,94.5 83.311,94.26 v1(83.235,94.184)
NetC2_2: C2.2 U1.22 | length 4.4
  Top Layer w0.203: C2.2 56.491,90.648 56.834,90.305 58.92,90.305 U1.22
NetLED1_1: LED1.1 R2.1 | length 2.6
  Top Layer w0.203: LED1.1 47.51,93.726 R2.1
NetLED2_1: LED2.1 R3.1 | length 2.4
  Top Layer w0.381: LED2.1 R3.1
NetLED3_1: LED3.1 R11.2 | length 2.2
  Top Layer w0.381: LED3.1 44.462,102.374 R11.2 R11.2@44.412,104.217
NetLED4_1: LED4.1 R12.2 | length 2.9
  Top Layer w0.203: R12.2 66.168,69.85 66.542,70.223 66.542,70.249 66.827,70.534 66.827,71.476 LED4.1
NetQ1_1: Q1.1 R4.2 | length 3.6
  Top Layer w0.203: R4.2 83.415,76.938 Q1.1
NetQ1_2: Q1.2 R7.1 U3.13 | length 48
  Top Layer w0.203: U3.13 v1(45.466,87.63) ; v1(78.486,72.39) 79.986,72.39 R7.1 80.01,72.391 80.383,72.765 80.409,72.765 82.548,74.905 83.16,74.905 Q1.2
  Bottom Layer w0.203: v1(45.466,87.63) 49.784,83.312 58.511,83.312 58.528,83.296 64.151,83.296 67.788,79.66 72.487,79.66 78.486,73.66 v1(78.486,72.39)
NetQ2_1: Q2.1 R7.2 | length 4.3
  Top Layer w0.381: R7.2 80.295,71.151 81.057,71.151 82.55,72.644 Q2.1
NetQ2_2: Q2.2 R4.1 U3.14 | length 50.5
  Top Layer w0.203: U3.14 v1(45.466,88.9) ; v1(78.74,75.311) 79.883,75.311 R4.1 v1(81.661,75.438) ; v1(81.661,70.485) 83.185,70.485 Q2.2
  Bottom Layer w0.203: v1(45.466,88.9) 50.597,83.769 64.324,83.769 67.977,80.116 73.935,80.116 v1(78.74,75.311) ; v1(81.661,70.485) v1(81.661,75.438)
NetR1_2: pad.4 R1.2 usb.B5 | length 17.8
  Top Layer w0.203: v1(30.099,83.439) 31.242,83.439 31.766,83.963 usb.B5 ; pad.4 34.671,91.694 35.409,92.432 R1.2
  Bottom Layer w0.203: v1(30.099,83.439) 29.21,84.328 29.21,88.9 pad.4
NetR6_2: R6.2 U7.16 | length 9.2
  Top Layer w0.203: R6.2 76.975,77.459 78.136,78.62 78.891,79.375 81.788,79.375 82.94,80.527 U7.16
NetR8_2: R8.2 U7.17 | length 12.1
  Top Layer w0.203: R8.2 77.14,75.616 77.14,75.972 79.527,78.359 82.296,78.359 84.94,81.003 U7.17
NetR19_1: R19.1 usb.A5 | length 8.6
  Top Layer w0.203: R19.1@29.059,92.964 29.433,92.591 29.583,92.591 30.099,92.075 30.099,88.392 31.522,86.969 33.014,86.969 usb.A5
nRST: SW1.2 U7.1 | length 23.3
  Top Layer w0.203: v1(89.789,78.867) 89.789,76.717 SW1.2 ; v1(93.675,96.05) 93.675,96.139 94.508,96.972 94.542,96.972 94.94,97.37 U7.1
  Bottom Layer w0.203: v1(89.789,78.867) 89.789,92.164 v1(93.675,96.05)
"OSC IN": C6.2 U1.5 X1.3 | length 10.8
  Top Layer w0.203: U1.5 66.792,89.806 67.079,90.094 67.079,90.103 70.218,93.242 70.218,94.253 70.25,94.285 C6.2 70.548,94.613 70.119,95.042 70.119,97.297 71.079,98.257 X1.3
"OSC OUT": C7.2 U1.6 X1.1 | length 8.5
  Top Layer w0.203: U1.6 66.486,90.112 66.773,90.4 66.781,90.4 69.579,93.198 69.579,94.242 C7.2 69.579,94.923 69.579,96.184 69.106,96.657 X1.1
PA0: JP7.16 U1.10 | length 28.8
  Top Layer w0.203: U1.10 65.518,92.02 65.518,98.395 80.787,113.665 JP7.16
PA1: JP7.15 U1.11 | length 27.5
  Top Layer w0.203: U1.11 64.67,91.894 65.061,92.285 65.061,100.367 JP7.15
PA2: H1.3 JP7.14 U1.12 | length 36.4
  Top Layer w0.203: U1.12 64.317,92.281 64.529,92.493 64.516,92.506 64.516,102.362 v1(66.548,104.394) JP7.14
  Bottom Layer w0.203: H1.3 56.441,104.468 66.474,104.468 v1(66.548,104.394)
PA3: H1.4 JP7.13 U1.13 | length 36
  Top Layer w0.203: U1.13 63.143,92.446 63.143,103.577 v1(66.627,107.061) 66.651,107.061 73.255,113.665 JP7.13
  Bottom Layer w0.203: H1.4 v1(66.627,107.061)
PA4: JP7.12 U1.14 U5.1 | length 52.7
  Top Layer w0.203: U1.14 63.002,91.891 62.484,92.408 62.484,105.41 JP7.12 ; v1(88.265,104.267) U5.1
  Bottom Layer w0.203: JP7.12 72.955,111.449 85.655,111.449 88.265,108.839 v1(88.265,104.267)
PA5: JP7.11 U1.15 U5.6 | length 49.2
  Top Layer w0.203: U1.15 62.648,91.54 61.976,92.212 61.976,107.442 JP7.11 ; U5.6 v1(86.106,106.807)
  Bottom Layer w0.203: JP7.11 70.872,110.992 84.715,110.992 86.106,109.601 v1(86.106,106.807)
PA6: JP7.10 U1.16 | length 24.5
  Top Layer w0.203: U1.16 62.295,91.187 61.493,91.988 61.493,109.499 JP7.10
PA7: JP7.9 U1.17 U5.5 | length 48.4
  Top Layer w0.203: U1.17 61.036,91.725 61.036,111.582 JP7.9 ; U5.5 84.328,108.126 v1(84.328,109.347)
  Bottom Layer w0.203: JP7.9 67.437,109.347 v1(84.328,109.347)
PA8: JP6.7 U1.29 | length 26
  Top Layer w0.203: JP6.7 58.9,63.599 58.9,83.988 U1.29
PA9: H2.1 JP6.8 U1.30 | length 31.7
  Top Layer w0.203: JP6.8 59.499,61.658 59.499,70.802 v1(59.563,70.866) 59.563,83.944 U1.30
  Bottom Layer w0.203: H2.1 v1(59.563,70.866)
PA10: H2.6 JP6.9 U1.31 | length 34
  Top Layer w0.203: U1.31 60.579,84.253 60.579,69.469 v1(61.849,68.199) 61.849,61.722 JP6.9
  Bottom Layer w0.203: H2.6 52.611,68.293 61.648,68.293 61.742,68.199 v1(61.849,68.199)
PA11: JP6.10 U1.32 | length 25.2
  Top Layer w0.203: U1.32 61.265,84.232 61.265,71.45 64.77,67.945 64.77,62.372 64.768,62.37 64.768,61.847 JP6.10
PA12: JP6.11 R12.1 U1.33 | length 25.8
  Top Layer w0.203: U1.33 62.295,84.541 61.722,83.969 61.722,72.205 62.17,71.757 63.957,69.969 64.549,69.969 65.042,69.477 65.042,69.427 67.056,67.412 JP6.11
PA15: JP6.12 U1.38 | length 24.3
  Top Layer w0.203: U1.38 67.437,81.081 67.437,80.264 69.521,78.18 69.521,61.67 JP6.12
PB0: JP7.8 U1.18 | length 23.6
  Top Layer w0.203: JP7.8 60.579,91.474 U1.18
PB1: JP7.7 U1.19 | length 24.9
  Top Layer w0.203: JP7.7 59.944,111.76 59.944,91.402 U1.19
PB2: JP7.6 R10.1 U1.20 | length 29.6
  Top Layer w0.203: JP7.6 59.182,109.982 59.182,91.457 U1.20 ; R10.1 v1(57.138,93.599)
  Bottom Layer w0.203: v1(57.138,93.599) v1(59.182,93.599)
PB3: JP6.13 U1.39 | length 25.6
  Top Layer w0.203: U1.39 68.072,81.153 68.072,80.713 68.636,80.149 69.978,78.807 69.978,63.753 JP6.13
PB4: JP6.14 U1.40 U5.2 | length 65.8
  Top Layer w0.203: U1.40 68.832,81.1 68.832,80.88 v1(68.908,80.804) 70.511,79.201 70.511,65.76 JP6.14 ; U5.2 v1(93.218,105.537)
  Bottom Layer w0.203: v1(68.908,80.804) 68.98,80.876 73.151,80.876 85.298,93.024 85.298,95.86 93.218,103.78 v1(93.218,105.537)
PB5: JP6.15 U1.41 | length 28.1
  Top Layer w0.203: U1.41 70.968,79.671 70.968,67.843 JP6.15
PB6: JP6.16 U1.42 | length 29.3
  Top Layer w0.203: U1.42 71.425,79.921 71.425,69.926 JP6.16
PB7: JP6.17 U1.43 | length 30.6
  Top Layer w0.203: U1.43 71.882,80.171 71.882,72.009 JP6.17
PB8: JP6.18 U1.45 | length 32.5
  Top Layer w0.203: U1.45 67.923,85.545 68.758,85.545 72.517,81.786 72.517,73.914 JP6.18
PB9: JP6.19 R13.1 SDCARD.CD1 U1.46 | length 70
  Top Layer w0.203: U1.46 67.512,86.676 67.903,86.285 68.759,86.285 70.68,84.364 70.938,84.364 v1(71.014,84.288) ; v1@71.039,84.264 73.025,82.277 73.025,75.565 86.636,61.954 86.66,61.954 87.02,61.595 JP6.19
  Bottom Layer w0.203: SDCARD.CD1 41.016,97.366 41.414,97.366 41.434,97.386 45.331,97.386 47.345,95.372 47.769,95.372 R13.1 ; R13.1@48.006,95.11 58.882,84.234 70.96,84.234 v1(71.014,84.288)
PB10: JP7.5 U1.21 | length 27.4
  Top Layer w0.203: JP7.5 58.42,108.204 58.42,91.512 U1.21
PB12: JP6.3 R14.1 SDCARD.2 U1.25 | length 72.4
  Top Layer w0.203: v1(41.91,96.012) 40.894,97.028 40.894,103.235 v1(42.426,104.767) ; JP6.3 48.641,63.5 50.673,63.5 55.626,68.453 v1(55.626,77.724) 55.626,83.543 U1.25 ; v1(52.578,79.121) v1(52.578,86.741)
  Bottom Layer w0.203: SDCARD.2 40.818,104.767 v1(42.426,104.767) 43.298,104.767 44.449,105.918 R14.1 ; v1(41.91,96.012) 41.968,95.954 41.968,95.319 50.546,86.741 v1(52.578,86.741) ; v1(52.578,79.121) 54.229,79.121 v1(55.626,77.724)
PB13: JP6.4 SDCARD.5 U1.26 | length 64.4
  Top Layer w0.203: v1(42.037,101.473) 42.037,99.949 42.799,99.187 v1(42.799,95.504) ; JP6.4 49.445,61.764 50.207,61.764 56.388,67.945 v1(56.388,76.835) 56.388,83.598 U1.26 ; v1(51.71,87.503) 51.71,78.545 52.197,78.058 v1(52.197,78.026)
  Bottom Layer w0.203: SDCARD.5 40.812,101.473 v1(42.037,101.473) ; v1(42.799,95.504) 43.561,95.504 51.486,87.579 51.634,87.579 v1(51.71,87.503) ; v1(52.197,78.026) 54.308,78.026 55.499,76.835 v1(56.388,76.835)
PB14: JP6.5 R15.1 SDCARD.7 U1.27 | length 63
  Top Layer w0.203: v1(44.704,95.61) 44.704,98.84 45.085,99.221 v1(45.085,99.314) ; JP6.5 52.068,61.847 52.576,61.847 57.15,66.421 v1(57.15,77.597) 57.15,83.653 U1.27 ; v1(53.234,80.01) 53.234,86.4 53.594,86.761 v1(53.594,86.868)
  Bottom Layer w0.203: SDCARD.7 40.771,99.314 v1(45.085,99.314) ; v1(44.704,95.61) 44.811,95.61 44.962,95.46 45.002,95.46 v1(53.594,86.868) ; v1@45.085,99.318 46.244,99.318 R15.1 ; v1(53.234,80.01) 54.737,80.01 56.388,78.359 v1(57.15,77.597)
PB15: JP6.6 R16.1 SDCARD.3 U1.28 | length 66.7
  Top Layer w0.203: v1(42.799,103.759) 42.799,100.076 43.561,99.314 v1(43.561,96.266) ; v1(53.889,81.026) 53.889,86.02 v1(54.737,86.868) ; JP6.6 58.039,65.278 58.039,83.835 U1.28
  Bottom Layer w0.203: SDCARD.3 40.808,103.759 v1(42.799,103.759) 43.548,103.759 44.437,102.87 R16.1 ; v1(43.561,96.266) 44.938,96.266 53.783,87.422 53.823,87.422 54.301,86.944 54.661,86.944 v1(54.737,86.868) ; v1(53.889,81.026) 53.965,80.95 54.724,80.95 58.039,77.635 v1(58.039,76.962)
PC13: JP7.17 U1.2 | length 38.3
  Top Layer w0.203: U1.2 67.866,88.698 68.257,89.089 68.671,89.089 70.073,87.687 76.643,87.687 77.597,88.642 77.597,107.569 83.439,113.411 JP7.17
PC14: C11.2 U1.3 X2.2 | length 8.5
  Top Layer w0.203: U1.3 68.142,89.695 69.067,89.695 70.142,90.771 71.644,90.771 71.648,90.767 71.793,90.767 C11.2 ; C11.2@72.167,90.424 72.506,90.763 73.56,90.763 74.425,89.898 X2.2
PC15: C12.2 U1.4 X2.1 | length 9
  Top Layer w0.203: U1.4 67.844,90.104 68.843,90.104 70.111,91.372 71.787,91.372 C12.2 72.471,91.371 72.614,91.371 72.62,91.365 73.491,91.365 74.425,92.298 X2.1
RST: C8.2 SW3.2 U1.7 | length 47.1
  Top Layer w0.203: SW3.2 39.573,108.754 39.573,108.703 39.691,108.585 45.028,108.585 45.828,109.385 C8.2 45.896,109.347 v1(47.625,109.347) ; U1.7 66.085,90.477 66.732,91.124 v1(66.732,91.135)
  Bottom Layer w0.203: v1(47.625,109.347) 48.376,109.347 49.911,107.812 49.911,95.392 56.909,88.394 59.184,88.394 59.714,88.924 64.522,88.924 v1(66.732,91.135)
RXD0: H1.1 H2.4 | length 38.1
  Top Layer w0.203: H2.4 48.613,69.441 48.613,71.092 51.456,73.935 v1(51.456,76.312) ; v1(51.054,80.645) 51.054,104.267 H1.1
  Bottom Layer w0.203: v1(51.054,80.645) 51.13,80.569 51.13,80.379 51.181,80.328 51.181,76.639 51.456,76.364 v1(51.456,76.312)
SD_DAT1: R17.1 SDCARD.8 | length 5.8
  Bottom Layer w0.203: SDCARD.8 46.332,98.218 R17.1
SD_DAT2: R18.1 SDCARD.1 | length 4.2
  Bottom Layer w0.381: SDCARD.1 41.067,105.918 42.591,107.442 R18.1
SWCLK: JP5.3 U1.37 | length 42.3
  Top Layer w0.203: U1.37 64.529,83.282 64.529,83.234 64.389,83.094 v1(64.389,81.431)
  Bottom Layer w0.203: JP5.3 40.767,82.677 62.298,82.677 62.319,82.698 62.862,82.698 62.883,82.677 63.665,82.677 64.313,82.029 64.313,81.507 v1(64.389,81.431)
SWDIO: JP5.2 U1.34 | length 40.4
  Top Layer w0.203: v1(62.378,82.026) 62.378,82.134 62.257,82.254 62.257,83.797 62.648,84.188 U1.34
  Bottom Layer w0.203: JP5.2 42.672,82.042 62.362,82.042 v1(62.378,82.026)
TXD0: H1.6 H2.3 | length 37.9
  Top Layer w0.203: H2.3 47.498,71.12 50.382,74.004 v1(50.382,76.353) ; v1(49.951,80.645) 50.027,80.721 50.027,80.951 50.038,80.962 50.038,103.133 49.911,103.26 49.911,105.918 H1.6@50.848,106.855
  Bottom Layer w0.203: v1(49.951,80.645) 49.951,80.538 50.038,80.451 50.038,76.671 50.355,76.353 v1(50.382,76.353)
VBAT: JP7.18 U1.1 | length 39.9
  Top Layer w0.203: U1.1 68.41,88.549 68.458,88.549 69.766,87.241 77.091,87.241 78.113,88.263 78.113,106.332 85.194,113.413 85.727,113.413 JP7.18
VCC: C1.2 C3.1 C4.1 C5.1 C13.1 C14.1 C15.1 C16.2 C17.2 C18.2 C19.2 C21.1 JP2.3 JP2.4 JP5.1 JP7.3 JP7.4 JP7.19 R2.2 R3.2 R5.2 R8.1 R11.1 R13.2 R14.2 R15.2 R16.2 R17.2 R18.2 R20.1 SDCARD.4 SW2.2 U1.9 U1.24 U1.36 U1.48 U2.2 U3.4 U3.16 U5.3 U5.7 U5.8 U7.8 | length 321.5
  Top Layer w0.203: U3.4 38.417,87.566 39.688,87.566 v1(39.751,87.503) ; C15.1 39.219,93.695 39.751,93.164 v1(39.751,91.059) ; v1(57.404,89.504) 58.352,88.557 59.254,88.557 U1.24 ; U1.36 63.143,83.282 63.143,83.234 63.246,83.131 63.246,81.026 64.143,80.129 64.173,80.129 64.516,79.787 C4.1 ; U1.9 66.091,91.887 66.091,92.302 v1(66.167,92.378) ; U1.48 68.418,87.171 69.293,87.171 70.463,86.001 C5.1
  Top Layer w0.381: SW2.2 38.735,103.124 41.123,105.512 45.326,105.512 45.652,105.185 45.652,104.552 45.937,104.267 R11.1 v1(48.133,104.267) 48.884,103.516 49.137,103.262 R2.2 ; U3.16 47.082,91.44 48.827,93.186 48.827,93.314 49.112,93.599 R2.2 ; JP7.3 JP7.4 ; v1(49.234,75.269) 49.243,75.278 49.243,76.141 49.255,76.152 49.255,77.957 R3.2 ; C3.1 56.708,88.101 56.708,87.315 54.916,85.523 54.916,78.482 53.584,77.151 51.07,77.151 50.242,77.978 R3.2 ; C5.1 71.192,86.001 71.391,86.2 72.513,86.2 74.168,84.545 74.168,76.327 74.899,75.596 75.05,75.596 75.548,75.098 75.548,74.205 v1(76.395,73.358) ; R5.2 R5.2@80.239,105.029 ; C16.2 80.264,105.054 R5.2@80.239,105.029 ; C19.2 82.054,101.855 82.054,100.202 C21.1 81.792,99.941 81.792,99.222 80.94,98.37 U7.8 80.893,97.917 v1(79.502,97.917) v1(79.502,102.87) ; R20.1 86.36,68.846 86.36,64.77 v1(87.63,63.5) ; JP7.19 88.519,113.634 89.281,112.872 v1(89.281,106.807) ; U5.3 v1(89.281,106.807) ; JP2.4 JP2.3 ; R2.2 49.207,93.53 49.207,78.047 R3.2 ; v1(79.502,102.87) 82.367,102.87 83.764,104.267 U5.8 U5.7 87.122,105.537 88.392,106.807 v1(89.281,106.807) ; v1(79.502,102.87) 79.502,104.267 79.954,104.719 79.954,104.744 R5.2@80.239,105.029
  Top Layer w0.508: C3.1 56.936,88.328 56.936,88.929 57.386,89.379 57.386,89.487 v1(57.404,89.504) ; v1(64.479,75.274) 64.479,75.299 64.516,75.336 C4.1
  Top Layer w0.635: v1(37.03,69.342) U2.2@37.231,69.342 ; C13.1 39.751,64.275 39.751,66.622 37.506,68.867 37.506,69.068 U2.2@37.231,69.342 ; v1(39.751,87.503) 39.751,75.692 v1(40.259,75.184) C14.1 38.965,71.277 37.506,69.817 37.506,69.617 U2.2@37.231,69.342
  Bottom Layer w0.203: v1(39.751,87.503) v1(39.751,91.059)
  Bottom Layer w0.381: SDCARD.4 42.647,102.618 43.657,101.608 45.739,101.608 45.962,101.831 R16.2 ; JP7.3 47.879,113.469 45.827,111.418 C18.2 45.825,111.385 45.825,108.841 C17.2 45.835,108.827 45.835,107.454 R18.2 45.91,107.379 45.91,105.981 R14.2 ; R17.2@47.981,98.044 R15.2@47.981,99.568 ; R15.2 R15.2@47.981,99.568 ; R13.2 R17.2 ; v1(48.133,104.267) 48.133,104.893 47.364,105.661 46.231,105.661 R14.2 ; R16.2 47.03,102.87 47.684,102.216 47.684,99.853 47.969,99.568 R15.2@47.981,99.568 ; R16.2 45.968,102.876 45.968,105.912 R14.2
  Bottom Layer w0.635: JP5.1 34.236,66.548 v1(37.03,69.342) ; v1(40.259,75.184) 40.365,75.29 49.196,75.29 49.214,75.272 64.477,75.272 v1(64.479,75.274) 64.516,75.311 74.442,75.311 v1(76.395,73.358) 76.395,65.718 78.74,63.373 87.444,63.373 87.571,63.5 v1(87.63,63.5) 87.672,63.458 87.827,63.458 87.891,63.394 93.747,63.394 JP2.4 ; v1(57.404,89.504) 60.395,92.495 63.246,92.495 ; v1(66.167,92.378) 65.187,92.378 C1.2 63.246,92.495 ; v1(79.502,97.917) 77.089,97.917 73.674,101.332 65.254,101.332 63.246,99.323 63.246,92.495
pads on no net: SDCARD. U2.4 U3.7 U3.8 U3.9 U3.10 U3.11 U3.12 U3.15 U7.9 U7.10 U7.11 U7.12 U7.13 U7.14 usb. usb.A8 usb.B8
copper on no net:
  other v3: 27.94,61.087 100.965,61.087 28.067,114.808 100.838,114.935

## Polygon pours and split planes (outlines as drawn)
GND on Top Layer "GND_L01_P013" (solid, remove dead copper, pour order 13): 25.416,112.792 39.689,112.792 39.689,117.466 103.369,117.466 103.378,117.475 103.378,100.33 95.758,100.33 95.76,100.328 95.76,99.497 78.604,99.497 78.49,99.611 78.49,80.84 78.546,80.784 95.361,80.784 95.361,79.564 95.355,79.557 95.361,79.551 103.375,79.551 103.375,58.677 103.378,58.674 25.4,58.674
VCC on Top Layer "VCC_L01_P012" (solid, remove dead copper, pour order 12): 43.054,91.995 43.054,91.041 43.255,90.84 43.26,90.846 47.256,90.846 47.256,90.843 48.505,89.593 48.505,75.267 49.093,74.679 49.697,74.679 49.845,74.827 49.845,77.123 49.621,77.347 49.621,79.928 49.39,80.159 49.39,104.223 48.589,105.025 45.403,105.025 45.152,104.773 45.152,103.598 45.172,103.598 45.443,103.327 48.567,103.327 48.858,103.036 48.849,103.027 48.849,101 48.827,100.978 48.827,95.211 48.362,94.745 48.385,94.721 48.385,93.317 47.702,92.634
VCC on Top Layer "VCC_L01_P011" (solid, remove dead copper, pour order 11): 37.722,87.917 40.284,87.917 40.513,87.688 40.513,80.264 40.515,80.262 40.515,75.796 41.021,75.29 41.021,71.563 39.41,69.952 39.41,68.538 40.896,67.052 40.896,63.766 40.386,63.256 39.302,63.256 39.302,63.258 38.862,63.698 38.862,66.925 37.788,67.999 36.827,67.999 36.129,68.698 36.133,68.702 36.133,69.86 37.207,70.934 37.626,70.934 37.626,70.942 38.394,71.71 38.394,80.965 39.262,81.832 39.262,87.919 39.271,87.928
+5 on Top Layer "+5_L01_P010" (solid, remove dead copper, pour order 10): 32.445,88.413 33.715,88.413 34.265,88.963 34.3,88.928 35.516,88.928 36.136,88.308 36.136,70.603 33.529,67.996 33.834,67.691 37.779,67.691 37.973,67.497 37.973,65.203 37.625,64.854 37.625,63.256 38.526,62.355 42.544,62.355 42.926,61.973 42.926,60.325 42.418,59.817 37.691,59.817 31.623,65.885 31.623,79.756 32.51,80.643 33.245,80.643 33.845,81.243 33.845,87.813
GND on Bottom Layer "GND_L02_P000" (solid, remove dead copper, pour order 0): 25.4,112.776 25.416,112.792 39.689,112.792 39.689,117.466 39.683,117.471 39.687,117.475 103.378,117.475 103.378,100.33 95.758,100.33 95.75,100.322 95.75,79.556 103.369,79.556 103.38,79.545 103.378,79.543 103.378,58.674 25.4,58.674

## Keep-outs
Keep-Out Layer:
  lines w0.254: 25.4,58.674 25.4,117.475 103.368,117.475 103.378,117.465 103.378,99.314 96.901,99.314 96.901,80.645 103.378,80.645 ; 25.4,58.674 25.4,58.674 ; 25.4,58.674 103.378,58.674 ; 103.378,58.674 103.378,58.674 ; 103.378,58.674 103.378,80.645 ; 103.378,80.645 103.378,80.645

## Other copper
Top Layer:
  pour cut-out: 72.39,99.314 67.818,99.314 67.818,95.631 68.326,95.631 68.326,94.107 68.834,93.599 68.834,93.091 66.457,90.714 66.332,90.714 66.332,90.64 67.31,89.662 68.707,91.059 68.707,91.313 71.374,93.98 71.374,95.631 72.39,95.631
  pour cut-out: 76.2,93.472 73.152,93.472 73.152,92.464 71.509,92.464 71.247,92.202 71.247,91.821 71.12,91.694 69.977,91.694 68.644,90.361 67.627,90.361 67.183,89.916 67.945,89.154 68.072,89.154 68.326,89.408 69.342,89.408 70.358,90.424 71.12,90.424 71.247,90.297 71.247,89.991 71.552,89.687 73.152,89.687 73.152,88.673 76.2,88.673
Bottom Layer:
  pour cut-out: 76.2,93.472 73.152,93.472 73.152,92.464 71.509,92.464 71.247,92.202 71.247,91.821 71.12,91.694 69.977,91.694 68.644,90.361 67.627,90.361 67.183,89.916 67.945,89.154 68.072,89.154 68.326,89.408 69.342,89.408 70.358,90.424 71.12,90.424 71.247,90.297 71.247,89.991 71.552,89.687 73.152,89.687 73.152,88.673 76.2,88.673
  pour cut-out: 72.39,99.314 67.818,99.314 67.818,95.631 68.326,95.631 68.326,94.107 68.834,93.599 68.834,93.091 66.457,90.714 66.332,90.714 66.332,90.64 67.31,89.662 68.707,91.059 68.707,91.313 71.374,93.98 71.374,95.631 72.39,95.631

## Silkscreen, mask and mechanical layers (free items; w line width, h text height)
Top Overlay:
  text "GND GND VCC VCC PB10 PB2 PB1 PB0 PA7 PA6 PA5 PA4 PA4 PA2 PA1 PA0 PC13 VBAT VCC GND" at 41.656,115.443 h1.2
  text "DESIGN BY / DACQUOC" at 31.242,114.173 h1.14
  text "GND ADC IO16" at 100.215,109.22 h1.14 r270
  text "IO13 IO12 IO14" at 93.103,109.093 h1.14 r270
  text "TXD0 NetH1_5 PA3 / RXD0 NETH1_2 PA2" at 49.137,100.457 h1.14
  text "GND SWCLK SWDIO VCC" at 31.115,75.819 h1.14 r270
  text "TXD0 NetH2_2 PA9 / RXD0 NETH2_5 PA10" at 45.978,72.136 h1.14
  text "IO4 IO5 VCC  / GND GND VCC" at 80.899,65.024 h1.14
  text "5V GND PB12 PB13 PB14 PB15 PA8 PA9 PA10 PA11 PA12 PA15 PB3 PB4 PB5 PB6 PB7 PB8 PB9 GND" at 40.767,59.182 h1.15
Bottom Overlay:
  text "DESIGN BY / DACQUOC" at 38.735,114.173 h1.14

## Text inside footprints (layer, text, board x,y; h text height)
U7: Mechanical 13 "ANTENNA" at 100.64,90.17 h1.14 r270